# Altium PCB NB3000XN.PcbDoc (part 17 of 71)
Units mil, origin at the board's own origin, x right, y up, seen from the top; angles counter-clockwise.
Board outline 9527.56 x 6929.77 mil, 6 copper layers (Top Layer, GND+SHIELD, MidLayer1, MidLayer2, P2 - 3V3+5V0, Bottom Layer), stack 62.375 mil thick; 832 components, 1027 nets, 4655 pads, 4981 vias.
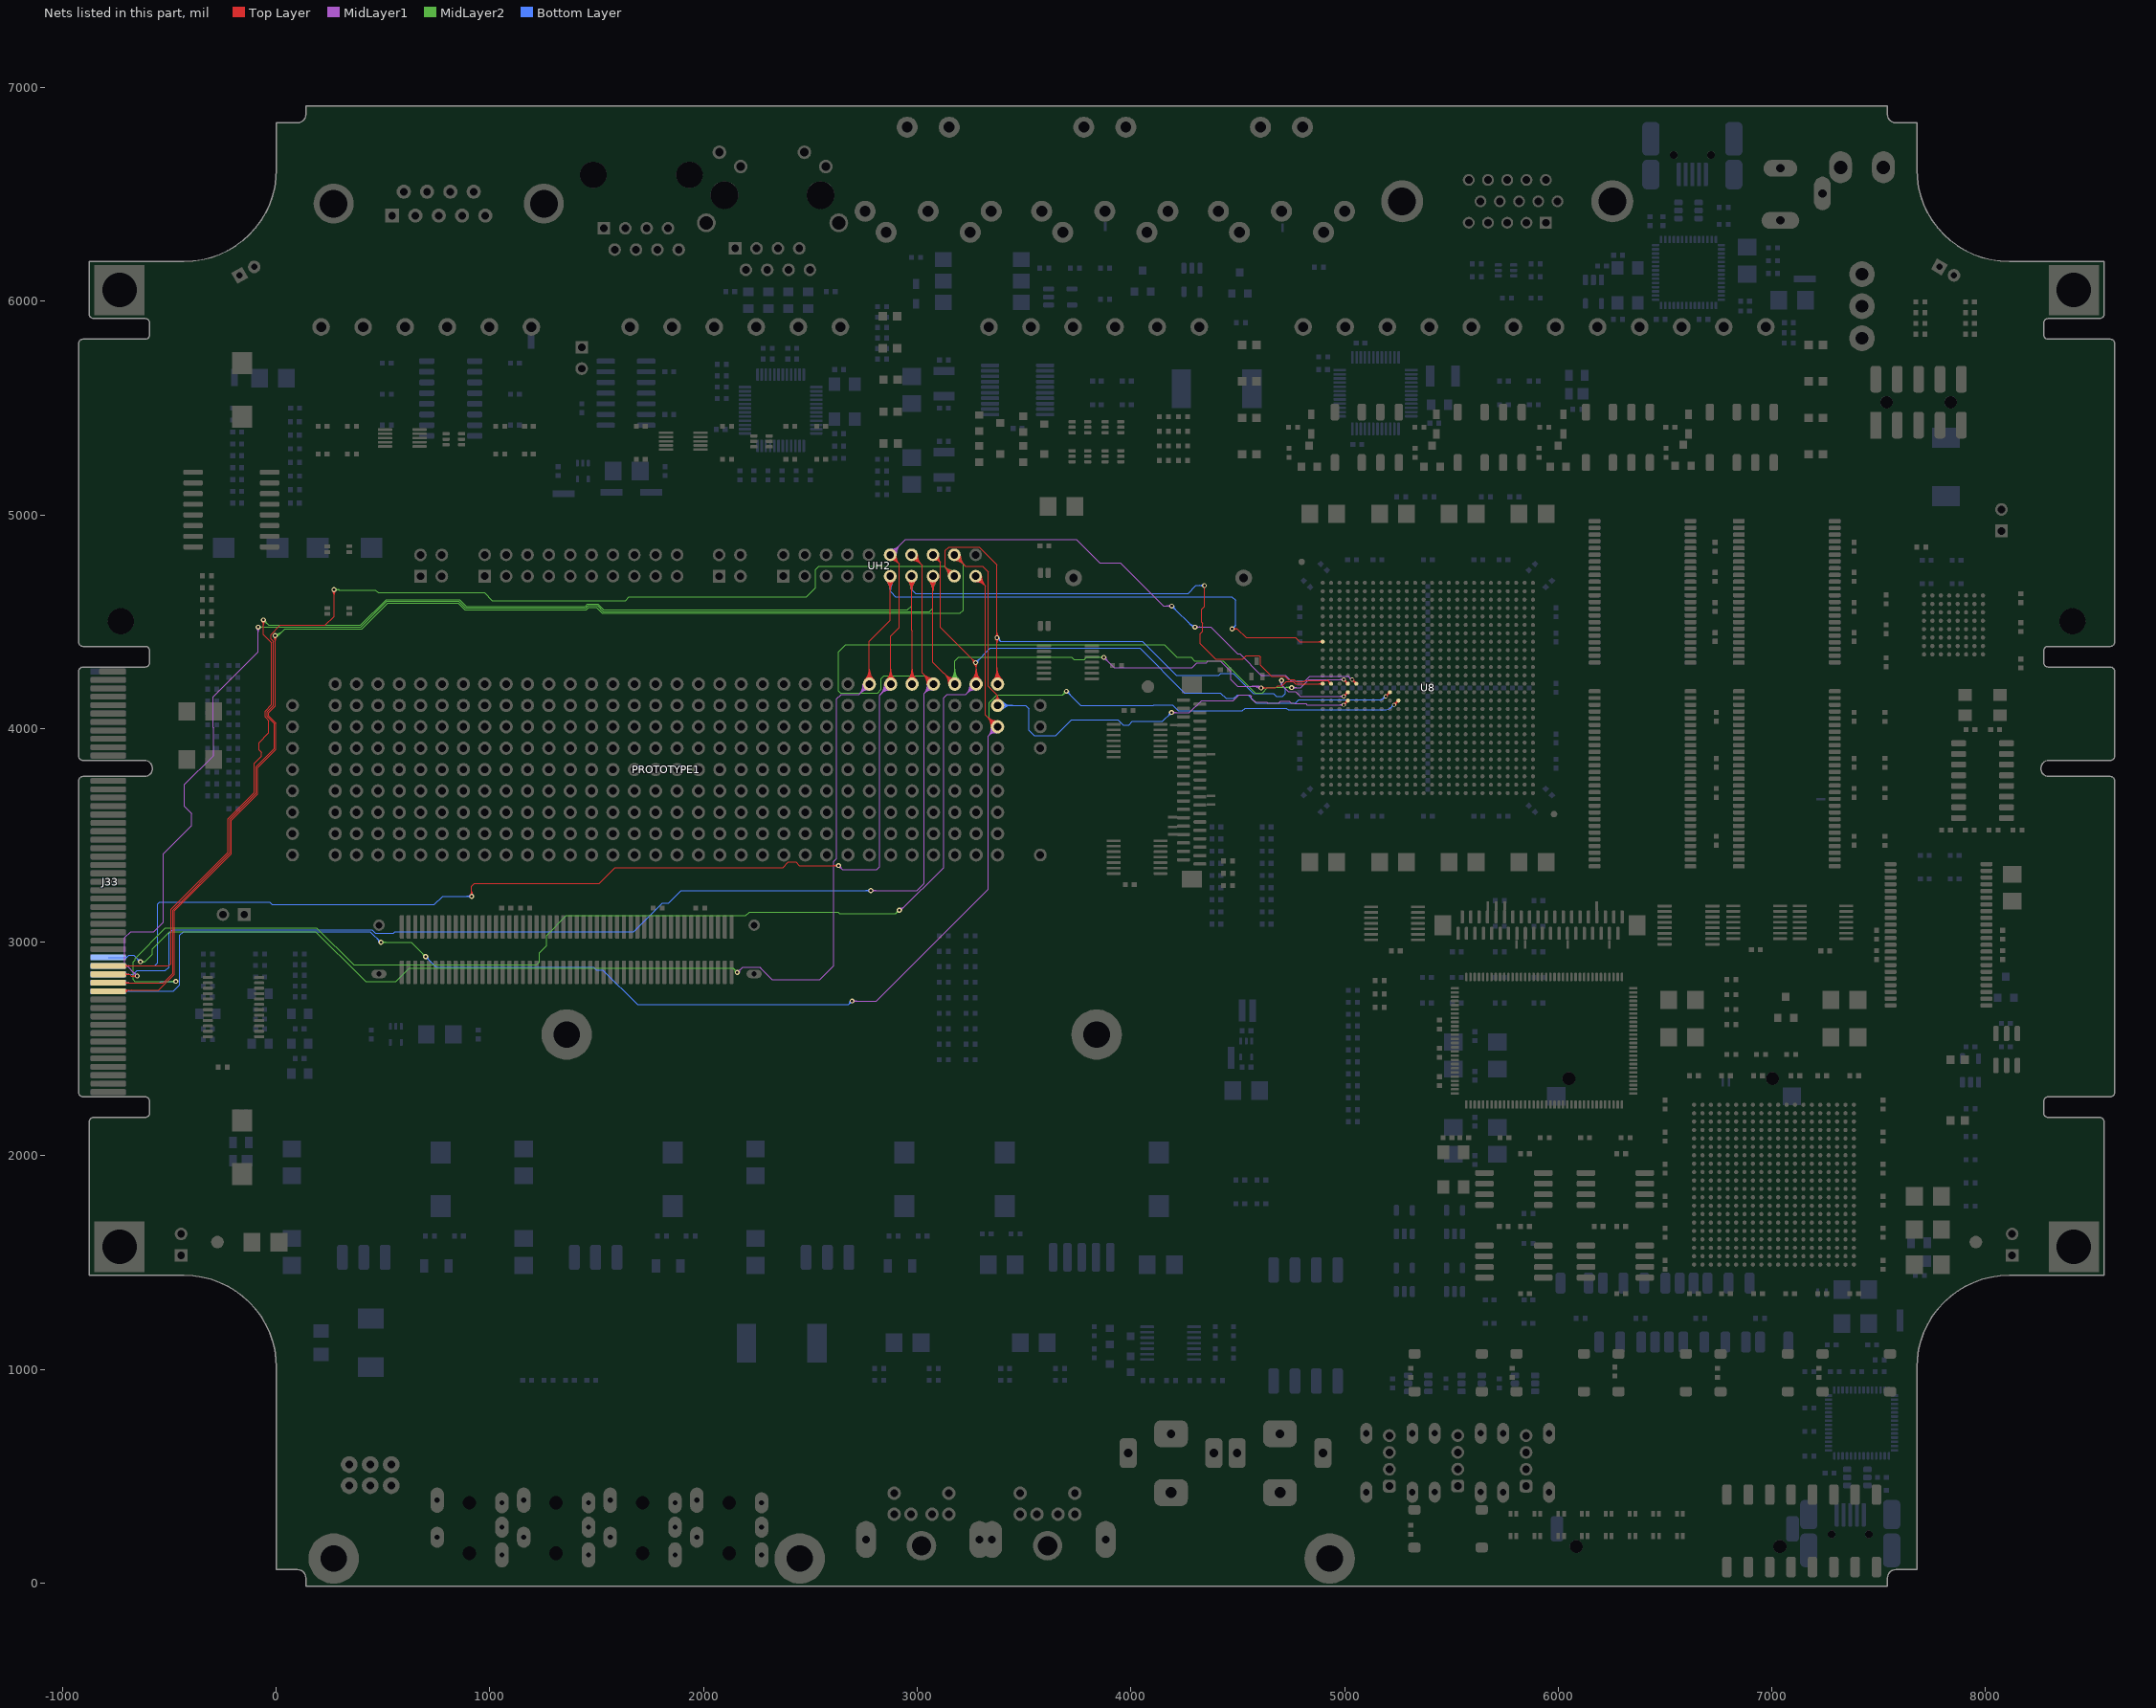
[diagram p21: the nets of this part, all layers, seen from the top]

## Via types
v1: diameter 23, hole 11.81, Top Layer to Bottom Layer, 3672 vias
v2: diameter 26, hole 11.81, Top Layer to Bottom Layer, 461 vias
v3: diameter 19, hole 11.81, Top Layer to Bottom Layer, tented both sides, 396 vias
v4: diameter 23.62, hole 11.81, Top Layer to Bottom Layer, 288 vias
v5: diameter 20, hole 11.81, Top Layer to Bottom Layer, 91 vias
v6: diameter 23, hole 11.81, Top Layer to Bottom Layer, tented both sides, 50 vias
v7: diameter 31, hole 11.81, Top Layer to Bottom Layer, 15 vias
v8: diameter 27.56, hole 11.81, Top Layer to Bottom Layer, tented both sides, 4 vias
v9: diameter 29, hole 11.81, Top Layer to Bottom Layer, 3 vias
v10: diameter 21, hole 11.81, Top Layer to Bottom Layer, 1 vias

## Nets (pads, with @x,y where several pads share a name; then routed paths per layer and width w, separated by ;. In a path a pad name is that pad's centre, name@x,y a point inside that pad or via, vN(x,y) a via of type N, cw(c..) or ccw(c..) an arc to the next point about the centre after c; other vN are vias at no path point) (continued)
ATE.UIO.IO27: J33.B33 PROTOTYPE1.H26 U8.H1 UH2.11 | length 9772.1
  Top Layer w4: PROTOTYPE1.H26@2755.62,4228.74 ccw(c2706.11,4278.25) 2776.12,4278.25 ccw(c2846.13,4278.25) PROTOTYPE1.H26@2796.63,4228.74 ; PROTOTYPE1.H26@2758.44,4225.91 ccw(c2715.77,4268.59) 2776.12,4268.59 ccw(c2836.48,4268.59) PROTOTYPE1.H26@2793.8,4225.91 ; PROTOTYPE1.H26@2761.27,4223.08 ccw(c2725.42,4258.93) 2776.12,4258.93 ccw(c2826.82,4258.93) PROTOTYPE1.H26@2790.97,4223.08 ; PROTOTYPE1.H26@2764.1,4220.26 ccw(c2735.08,4249.28) 2776.12,4249.28 ccw(c2817.16,4249.28) PROTOTYPE1.H26@2788.14,4220.26 ; PROTOTYPE1.H26@2766.93,4217.43 ccw(c2744.74,4239.62) 2776.12,4239.62 ccw(c2807.51,4239.62) PROTOTYPE1.H26@2785.31,4217.43 ; PROTOTYPE1.H26@2776.12,4208.23 2776.12,4408.37 2873.76,4506.01 UH2.11@2873.76,4713.23 ; UH2.11@2854.29,4693.77 cw(c2807.3,4646.78) 2873.76,4646.78 cw(c2940.21,4646.78) UH2.11@2893.22,4693.77 ; UH2.11@2857.12,4696.6 cw(c2816.96,4656.43) 2873.76,4656.43 cw(c2930.56,4656.43) UH2.11@2890.4,4696.6 ; UH2.11@2859.95,4699.43 cw(c2826.61,4666.09) 2873.76,4666.09 cw(c2920.9,4666.09) UH2.11@2887.57,4699.43 ; UH2.11@2862.78,4702.25 cw(c2836.27,4675.75) 2873.76,4675.75 cw(c2911.24,4675.75) UH2.11@2884.74,4702.25 ; v1(4473.52,4466.71) 4498.29,4466.71 4539.13,4425.87 4770.7,4425.87 4790.03,4406.54 4860,4406.54 4870,4406.54 U8.H1@4897.87,4406.54 ; v1@4477.41,4462.82 cw(c4486.8,4453.43) 4486.8,4466.71 cw(c4486.8,4479.99) v1@4477.41,4470.6 ; v1@4480.24,4459.99 cw(c4496.46,4443.77) 4496.46,4466.71 cw(c4496.46,4489.64) v1@4480.24,4473.43 ; U8.H1@4892.57,4401.23 ccw(c4879.77,4388.43) 4879.77,4406.54 ccw(c4879.77,4424.64) U8.H1@4892.57,4411.84 ; U8.H1@4892.68,4401.34 ccw(c4880.15,4388.81) 4880.15,4406.54 ccw(c4880.15,4424.26) U8.H1@4892.68,4411.73
  MidLayer1 w4: v1(2157.86,2858.37) 2182.86,2883.37 2263.86,2883.37 2266.12,2881.12 ; v1@2157.86,2863.87 ccw(c2157.86,2877.15) 2167.25,2867.76 ccw(c2176.64,2858.37) v1@2163.36,2858.37 ; v1@2157.86,2867.87 ccw(c2157.86,2890.81) 2174.07,2874.59 ccw(c2190.29,2858.37) v1@2167.36,2858.37 ; 2265,2880 2320.29,2824.71 2545.21,2824.71 2610,2889.5 2610,3378.18 2623.52,3391.71 2623.52,4138.52 2645,4160 2727.89,4160 ; PROTOTYPE1.H26@2747.13,4207.7 cw(c2681.42,4206.47) 2727.89,4160 ; PROTOTYPE1.H26@2751.13,4207.77 cw(c2694.48,4206.72) 2734.54,4166.66 cw(c2774.6,4126.59) PROTOTYPE1.H26@2775.66,4183.24 ; PROTOTYPE1.H26@2755.12,4207.84 cw(c2707.54,4206.96) 2741.19,4173.31 cw(c2774.85,4139.66) PROTOTYPE1.H26@2775.73,4187.24 ; PROTOTYPE1.H26@2759.12,4207.92 cw(c2720.61,4207.2) 2747.85,4179.96 cw(c2775.09,4152.72) PROTOTYPE1.H26@2775.8,4191.24 ; PROTOTYPE1.H26@2775.58,4179.24 ccw(c2774.36,4113.53) 2727.89,4160 ; PROTOTYPE1.H26@2776.12,4208.23 2727.89,4160
  MidLayer2 w4: v1(-635.48,2908.37) -615,2908.37 ; v1@-631.28,2904.82 cw(c-623.62,2898.35) -623.62,2908.37 cw(c-623.62,2918.4) v1@-631.28,2911.93 ; v1@-628.22,2902.24 cw(c-615,2891.06) -615,2908.37 ; v1@-628.22,2914.51 ccw(c-615,2925.69) -615,2908.37 ; v1@2148.36,2858.37 ccw(c2125.42,2858.37) 2141.64,2874.59 ccw(c2157.86,2890.81) v1@2157.86,2867.87 ; v1@2152.36,2858.37 ccw(c2139.08,2858.37) 2148.47,2867.76 ccw(c2157.86,2877.15) v1@2157.86,2863.87 ; v1(2157.86,2858.37) 2138.23,2878 623,2878 560,2815 418.69,2815 395.84,2837.85 183.65,3050.04 -498.5,3050.04 -580,2968.54 -580,2943.37 -615,2908.37
  Bottom Layer w4: J33.B33@-785.98,2928.45 -701.3,2928.45 ; J33.B33@-705.79,2925.1 cw(c-701.31,2923.77) -701.31,2928.45 ; J33.B33@-705.79,2931.8 ccw(c-701.31,2933.13) -701.31,2928.45 ; v1@-644.98,2908.37 ccw(c-667.91,2908.37) -651.69,2924.59 ccw(c-635.48,2940.81) v1@-635.48,2917.87 ; v1@-640.98,2908.37 ccw(c-654.25,2908.37) -644.86,2917.76 ccw(c-635.48,2927.15) v1@-635.48,2913.87 ; v1(-635.48,2908.37) -667.45,2940.35 -689.41,2940.35 -701.3,2928.45 ; UH2.11@2854.29,4693.77 cw(c2804.3,4643.78) 2875,4643.78 ; UH2.11@2857.12,4696.6 cw(c2813.96,4653.44) 2875,4653.44 ; UH2.11@2859.95,4699.43 cw(c2823.62,4663.09) 2875,4663.09 ; UH2.11@2862.78,4702.25 cw(c2833.28,4672.75) 2875,4672.75 ; UH2.11@2865.61,4705.08 cw(c2842.93,4682.41) 2875,4682.41 ; UH2.11@2873.76,4713.23 UH2.11@2875,4713.23 ; 2875,4649.77 cw(c2937.22,4649.77) UH2.11@2893.22,4693.77 ; 2875,4659.43 cw(c2927.56,4659.43) UH2.11@2890.4,4696.6 ; 2875,4669.09 cw(c2917.91,4669.09) UH2.11@2887.57,4699.43 ; 2875,4678.74 cw(c2908.25,4678.74) UH2.11@2884.74,4702.25 ; UH2.11@2875,4715 UH2.11@2875,4713.23 ; v1(4473.52,4466.71) 4490.19,4483.37 4490.19,4600.04 4473.52,4616.71 2898.52,4616.71 2875,4640.23 UH2.11@2875,4713.23 ; v1@4473.52,4472.21 ccw(c4473.52,4485.49) 4482.91,4476.1 ccw(c4492.3,4466.71) v1@4479.02,4466.71 ; v1@4473.52,4476.21 ccw(c4473.52,4499.14) 4489.74,4482.93 ccw(c4505.96,4466.71) v1@4483.02,4466.71
ATE.UIO.IO28: J33.B34 PROTOTYPE1.H27 U8.N5 UH2.12 | length 10153.7
  Top Layer w4: v1@908.3,3221.74 ccw(c892.14,3238.01) 915.07,3237.93 ccw(c938.01,3237.86) v1@921.74,3221.7 ; v1@911.12,3218.9 ccw(c901.76,3228.32) 915.04,3228.28 ccw(c928.32,3228.24) v1@918.9,3218.88 ; v1(915,3215) 915.15,3262.19 928,3275.04 1512.21,3275.04 1586.88,3349.71 2371.52,3349.71 2396.86,3375.04 2431.86,3375.04 2448.52,3358.37 v1(2631.86,3358.37) ; v1@2625.14,3351.66 ccw(c2608.92,3335.44) 2608.92,3358.37 ccw(c2608.92,3381.31) v1@2625.14,3365.09 ; v1@2627.97,3354.49 ccw(c2618.58,3345.1) 2618.58,3358.37 ccw(c2618.58,3371.65) v1@2627.97,3362.26 ; PROTOTYPE1.H27@2855.62,4228.74 ccw(c2806.11,4278.25) 2876.12,4278.25 ccw(c2946.13,4278.25) PROTOTYPE1.H27@2896.63,4228.74 ; PROTOTYPE1.H27@2858.44,4225.91 ccw(c2815.77,4268.59) 2876.12,4268.59 ccw(c2936.48,4268.59) PROTOTYPE1.H27@2893.8,4225.91 ; PROTOTYPE1.H27@2861.27,4223.08 ccw(c2825.42,4258.93) 2876.12,4258.93 ccw(c2926.82,4258.93) PROTOTYPE1.H27@2890.97,4223.08 ; PROTOTYPE1.H27@2864.1,4220.26 ccw(c2835.08,4249.28) 2876.12,4249.28 ccw(c2917.16,4249.28) PROTOTYPE1.H27@2888.14,4220.26 ; PROTOTYPE1.H27@2866.93,4217.43 ccw(c2844.74,4239.62) 2876.12,4239.62 ccw(c2907.51,4239.62) PROTOTYPE1.H27@2885.31,4217.43 ; UH2.12@2873.76,4813.23 2915.19,4771.8 ; UH2.12@2875.2,4797.77 cw(c2877.75,4770.48) 2897.13,4789.86 cw(c2916.51,4809.24) UH2.12@2889.22,4811.79 ; UH2.12@2875.57,4793.79 cw(c2878.77,4759.47) 2903.15,4783.84 cw(c2927.52,4808.22) UH2.12@2893.2,4811.42 ; UH2.12@2875.94,4789.81 cw(c2879.8,4748.46) 2909.17,4777.82 cw(c2938.53,4807.19) UH2.12@2897.18,4811.05 ; PROTOTYPE1.H27@2876.12,4208.23 2876.12,4433.37 2915.19,4472.44 2915.19,4771.8 ; UH2.12@2876.32,4785.83 cw(c2880.83,4737.45) 2915.19,4771.8 ; UH2.12@2901.17,4810.68 ccw(c2949.55,4806.16) 2915.19,4771.8 ; v3(5035.67,4229.37) U8.N5@5055.35,4209.69 ; U8.N5@5047.85,4209.69 ccw(c5029.75,4209.69) 5042.55,4222.49 ccw(c5055.35,4235.29) U8.N5@5055.35,4217.19 ; U8.N5@5048.01,4209.69 ccw(c5030.29,4209.69) 5042.82,4222.22 ccw(c5055.35,4234.75) U8.N5@5055.35,4217.03 ; 5048.47,4216.57 ccw(c5035.67,4203.76) 5035.67,4221.87 cw(c5035.67,4203.76) 5048.47,4216.57 ; 5048.47,4216.57 cw(c5061.28,4229.37) 5043.17,4229.37 ccw(c5061.28,4229.37) 5048.47,4216.57
  MidLayer1 w4: v1@2631.86,3348.87 cw(c2631.86,3325.94) 2648.07,3342.16 cw(c2664.29,3358.37) v1@2641.36,3358.37 ; v1@2631.86,3352.87 cw(c2631.86,3339.6) 2641.25,3348.99 cw(c2650.64,3358.37) v1@2637.36,3358.37 ; v1(2631.86,3358.37) 2650.23,3340 2810,3340 2823.52,3353.52 2823.52,4155.64 PROTOTYPE1.H27@2876.12,4208.23 ; PROTOTYPE1.H27@2847.12,4208.23 cw(c2777.11,4208.23) 2826.62,4158.73 cw(c2876.12,4109.22) PROTOTYPE1.H27@2876.12,4179.23 ; PROTOTYPE1.H27@2851.12,4208.23 cw(c2790.77,4208.23) 2833.44,4165.56 cw(c2876.12,4122.88) PROTOTYPE1.H27@2876.12,4183.23 ; PROTOTYPE1.H27@2855.12,4208.23 cw(c2804.42,4208.23) 2840.27,4172.39 cw(c2876.12,4136.54) PROTOTYPE1.H27@2876.12,4187.23 ; PROTOTYPE1.H27@2859.12,4208.23 cw(c2818.08,4208.23) 2847.1,4179.21 cw(c2876.12,4150.19) PROTOTYPE1.H27@2876.12,4191.23 ; PROTOTYPE1.H27@2863.12,4208.23 cw(c2831.74,4208.23) 2853.93,4186.04 cw(c2876.12,4163.85) PROTOTYPE1.H27@2876.12,4195.23 ; UH2.12@2873.52,4813.23 UH2.12@2873.76,4813.23 2945.54,4885 3744.71,4885 3855,4774.71 3951.61,4774.71 4152.61,4573.71 v1(4191.52,4573.71) ; UH2.12@2873.76,4828.76 ccw(c2873.76,4866.28) 2900.29,4839.75 ; UH2.12@2873.76,4832.76 ccw(c2873.76,4879.93) 2907.11,4846.58 ; UH2.12@2873.76,4836.76 ccw(c2873.76,4893.59) 2913.94,4853.41 ; UH2.12@2873.76,4840.76 ccw(c2873.76,4907.25) 2920.77,4860.23 ; UH2.12@2889.29,4813.23 cw(c2926.74,4813.23) 2900.26,4839.72 ; UH2.12@2893.29,4813.23 cw(c2940.4,4813.23) 2907.09,4846.55 ; UH2.12@2897.29,4813.23 cw(c2954.06,4813.23) 2913.91,4853.38 ; UH2.12@2901.29,4813.23 cw(c2967.71,4813.23) 2920.74,4860.21 ; v1@4184.81,4566.99 ccw(c4168.59,4550.77) 4168.59,4573.71 ccw(c4168.59,4596.64) v1@4184.81,4580.43 ; v1@4187.64,4569.82 ccw(c4178.25,4560.43) 4178.25,4573.71 ccw(c4178.25,4586.99) v1@4187.64,4577.6 ; v1@4303.89,4471.11 cw(c4313.38,4461.62) 4313.38,4475.04 ; v1@4303.89,4478.89 ccw(c4313.18,4488.18) 4313.18,4475.04 ; v1@4306.72,4468.28 cw(c4323.03,4451.97) 4323.03,4475.04 ; v1@4306.72,4481.72 ccw(c4322.84,4497.84) 4322.84,4475.04 ; 5022.09,4240.76 ccw(c5012.16,4230.83) 5012.16,4244.88 4918.62,4244.88 4870,4244.88 4860,4244.88 4837.69,4244.88 4815.19,4222.37 4751.19,4222.37 4723.52,4250.04 4609.84,4250.04 4509.84,4350.04 4498.52,4350.04 4373.52,4475.04 v1@4300.04,4475.04 ; v3@5028.2,4228.72 ccw(c5010.16,4227.14) 5021.8,4241.01 ccw(c5033.44,4254.88) v3@5035.02,4236.84 ; v1(4300,4475) v1@4300.04,4475.04
  Bottom Layer w4: J33.B34@-785.98,2889.08 -567.81,2889.08 -554.41,2902.48 -554.41,3179.28 -546.69,3187 -29.82,3187 -19,3176.19 740.09,3176.19 778.9,3215 v1(915,3215) ; J33.B34@-711.58,2883.58 cw(c-698.3,2870.3) -698.3,2889.08 ; J33.B34@-711.58,2894.58 ccw(c-698.3,2907.86) -698.3,2889.08 ; J33.B34@-708.76,2880.75 cw(c-688.65,2860.64) -688.65,2889.08 cw(c-688.64,2917.52) J33.B34@-708.76,2897.41 ; v1@908.28,3208.28 ccw(c892.06,3192.06) 892.06,3215 ccw(c892.06,3237.93) v1@908.28,3221.72 ; v1@911.11,3211.11 ccw(c901.72,3201.72) 901.72,3215 ccw(c901.72,3228.28) v1@911.11,3218.89 ; v1@4191.52,4564.21 cw(c4191.52,4541.27) 4207.74,4557.49 cw(c4223.96,4573.71) v1@4201.02,4573.71 ; v1@4191.52,4568.21 cw(c4191.52,4554.93) 4200.91,4564.32 cw(c4210.3,4573.71) v1@4197.02,4573.71 ; v1(4191.52,4573.71) 4290.19,4475.04 4306.86,4475.04 4306.82,4475 v1(4300,4475) ; 4267.11,4498.13 ccw(c4300,4531.02) v1@4300,4484.5 ; 4273.93,4491.3 ccw(c4300,4517.36) v1@4300,4480.5 ; 4280.76,4484.47 ccw(c4300,4503.71) v1@4300,4476.5 ; 4287.59,4477.64 ccw(c4300,4490.05) v1@4300,4472.5
ATE.UIO.IO29: J33.A34 PROTOTYPE1.H28 U8.N2 UH2.13 | length 9997.1
  Top Layer w4: J33.A34@-785.98,2889.08 -503.06,2889.08 -492.14,2900 -492.14,3154.02 -292.32,3353.85 -225.35,3420.81 -225.35,3578.34 -102,3701.69 -102,3838.1 -68.14,3871.96 -68.14,3888.14 -81,3901 -81,3933.85 -35,3979.85 -35,4037.56 -51.48,4054.04 -51.48,4081.15 -21,4111.63 -21,4401 -59.81,4439.81 v1(-59.81,4508.37) ; J33.A34@-711.58,2883.58 cw(c-698.3,2870.3) -698.3,2889.08 ; J33.A34@-711.58,2894.58 ccw(c-698.3,2907.86) -698.3,2889.08 ; J33.A34@-708.76,2880.75 cw(c-688.65,2860.64) -688.65,2889.08 cw(c-688.64,2917.52) J33.A34@-708.76,2897.41 ; v1@-66.53,4501.66 cw(c-82.74,4485.44) -59.81,4485.44 cw(c-36.87,4485.44) v1@-53.09,4501.66 ; v1@-63.7,4504.49 cw(c-73.09,4495.1) -59.81,4495.1 cw(c-46.53,4495.1) v1@-55.92,4504.49 ; UH2.13@2954.29,4693.77 cw(c2907.3,4646.78) 2973.76,4646.78 cw(c3040.21,4646.78) UH2.13@2993.22,4693.77 ; PROTOTYPE1.H28@2955.62,4228.74 ccw(c2906.11,4278.25) 2976.12,4278.25 ccw(c3046.13,4278.25) PROTOTYPE1.H28@2996.63,4228.74 ; UH2.13@2957.12,4696.6 cw(c2916.96,4656.43) 2973.76,4656.43 cw(c3030.56,4656.43) UH2.13@2990.4,4696.6 ; PROTOTYPE1.H28@2958.44,4225.91 ccw(c2915.77,4268.59) 2976.12,4268.59 ccw(c3036.48,4268.59) PROTOTYPE1.H28@2993.8,4225.91 ; UH2.13@2959.95,4699.43 cw(c2926.61,4666.09) 2973.76,4666.09 cw(c3020.9,4666.09) UH2.13@2987.57,4699.43 ; PROTOTYPE1.H28@2961.27,4223.08 ccw(c2925.42,4258.93) 2976.12,4258.93 ccw(c3026.82,4258.93) PROTOTYPE1.H28@2990.97,4223.08 ; UH2.13@2962.78,4702.25 cw(c2936.27,4675.75) 2973.76,4675.75 cw(c3011.24,4675.75) UH2.13@2984.74,4702.25 ; PROTOTYPE1.H28@2964.1,4220.26 ccw(c2935.08,4249.28) 2976.12,4249.28 ccw(c3017.16,4249.28) PROTOTYPE1.H28@2988.14,4220.26 ; PROTOTYPE1.H28@2966.93,4217.43 ccw(c2944.74,4239.62) 2976.12,4239.62 ccw(c3007.51,4239.62) PROTOTYPE1.H28@2985.31,4217.43 ; UH2.13@2973.76,4713.23 2973.76,4460.74 2976.12,4458.37 PROTOTYPE1.H28@2976.12,4208.23 ; v1(4344.52,4669.37) 4344.52,4570.84 4332,4558.31 4332,4497.27 4335,4494.27 4335,4454.52 4331.86,4451.37 ; U8.N2@4929.9,4209.69 ccw(c4912.17,4209.69) 4924.71,4222.22 ; U8.N2@4937.24,4217.03 cw(c4937.24,4234.75) 4924.71,4222.22 ; 4324.02,4443.54 4331.86,4451.37 ; 4324.02,4443.54 4331.86,4451.37 ; 4324.02,4443.54 4324.02,4397.81 4396.8,4325.04 4523.52,4325.04 4540.19,4341.71 4600.52,4341.71 4606.86,4335.37 4606.86,4296.71 4658.52,4245.04 4720.21,4245.04 4736.54,4228.71 4746,4228.71 4762.92,4228.71 4771.63,4220 4786.9,4220 4801,4220 4810,4220 4815.19,4225.19 4855.26,4225.19 4860,4225.19 4870,4225.19 4917.53,4225.19 cw(c4917.53,4215.04) 4924.71,4222.22
  MidLayer2 w4: v1@-59.81,4498.87 cw(c-59.81,4475.94) -43.59,4492.16 cw(c-27.37,4508.37) v1@-50.31,4508.37 ; v1@-59.81,4502.87 cw(c-59.81,4489.6) -50.42,4498.99 cw(c-41.03,4508.37) v1@-54.31,4508.37 ; v1(-59.81,4508.37) -34.81,4483.37 394.96,4483.37 515.4,4603.81 858,4603.81 889.31,4572.5 1445.98,4572.5 1448.52,4575.04 1456.86,4583.37 1505.5,4583.37 1532.88,4556 2955,4556 2973.76,4574.76 UH2.13@2973.76,4713.23 ; UH2.13@2954.29,4693.77 cw(c2907.3,4646.78) 2973.76,4646.78 cw(c3040.22,4646.78) UH2.13@2993.22,4693.77 ; UH2.13@2957.12,4696.6 cw(c2916.96,4656.43) 2973.76,4656.43 cw(c3030.56,4656.43) UH2.13@2990.4,4696.6 ; UH2.13@2959.95,4699.43 cw(c2926.62,4666.09) 2973.76,4666.09 cw(c3020.9,4666.09) UH2.13@2987.57,4699.43 ; UH2.13@2962.78,4702.25 cw(c2936.27,4675.75) 2973.76,4675.75 cw(c3011.25,4675.75) UH2.13@2984.74,4702.25
  Bottom Layer w4: UH2.13@2955.3,4692.81 cw(c2917.73,4651.24) 2973.76,4651.24 ; UH2.13@2957.98,4695.78 cw(c2925.87,4660.25) 2973.76,4660.25 cw(c3021.65,4660.25) UH2.13@2989.54,4695.78 ; UH2.13@2960.66,4698.75 cw(c2934.01,4669.26) 2973.76,4669.26 cw(c3013.51,4669.26) UH2.13@2986.85,4698.75 ; UH2.13@2963.35,4701.72 cw(c2942.15,4678.27) 2973.76,4678.27 cw(c3005.37,4678.27) UH2.13@2984.17,4701.72 ; UH2.13@2973.76,4713.23 2973.76,4651.24 ; UH2.13@2992.22,4692.81 ccw(c3029.79,4651.24) 2973.76,4651.24 ; v1@4337.81,4662.66 ccw(c4321.59,4646.44) 4321.59,4669.37 ccw(c4321.59,4692.31) v1@4337.81,4676.09 ; v1@4340.64,4665.49 ccw(c4331.25,4656.1) 4331.25,4669.37 ccw(c4331.25,4682.65) v1@4340.64,4673.26 ; v1(4344.52,4669.37) 4304.37,4669.37 4267.71,4632.71 2992.29,4632.71 2973.76,4651.24
ATE.UIO.IO30: J33.B35 PROTOTYPE1.H29 U8.N4 UH2.14 | length 10675.6
  Top Layer w4: UH2.14@2973.76,4785.71 cw(c2973.76,4719.25) 3020.75,4766.24 cw(c3067.74,4813.23) UH2.14@3001.29,4813.23 ; UH2.14@2973.76,4789.71 cw(c2973.76,4732.91) 3013.92,4773.07 cw(c3054.09,4813.23) UH2.14@2997.29,4813.23 ; UH2.14@2973.76,4793.71 cw(c2973.76,4746.56) 3007.09,4779.9 cw(c3040.43,4813.23) UH2.14@2993.29,4813.23 ; UH2.14@2973.76,4797.71 cw(c2973.76,4760.22) 3000.27,4786.73 cw(c3026.77,4813.23) UH2.14@2989.29,4813.23 ; UH2.14@2973.76,4813.23 3023.52,4763.47 3023.52,4260.83 PROTOTYPE1.H29@3076.12,4208.23 ; PROTOTYPE1.H29@3047.12,4208.23 ccw(c2977.11,4208.23) 3026.62,4257.74 ccw(c3076.12,4307.25) PROTOTYPE1.H29@3076.12,4237.23 ; PROTOTYPE1.H29@3051.12,4208.23 ccw(c2990.77,4208.23) 3033.44,4250.91 ccw(c3076.12,4293.59) PROTOTYPE1.H29@3076.12,4233.23 ; PROTOTYPE1.H29@3055.12,4208.23 ccw(c3004.42,4208.23) 3040.27,4244.08 ccw(c3076.12,4279.93) PROTOTYPE1.H29@3076.12,4229.23 ; PROTOTYPE1.H29@3059.12,4208.23 ccw(c3018.08,4208.23) 3047.1,4237.26 ccw(c3076.12,4266.28) PROTOTYPE1.H29@3076.12,4225.23 ; PROTOTYPE1.H29@3063.12,4208.23 ccw(c3031.74,4208.23) 3053.93,4230.43 ccw(c3076.12,4252.62) PROTOTYPE1.H29@3076.12,4221.23 ; v3(4996.3,4229.37) U8.N4@5015.98,4209.69 ; U8.N4@5008.48,4209.69 ccw(c4990.38,4209.69) 5003.18,4222.49 ccw(c5015.98,4235.29) U8.N4@5015.98,4217.19 ; U8.N4@5008.64,4209.69 ccw(c4990.92,4209.69) 5003.45,4222.22 ccw(c5015.98,4234.75) U8.N4@5015.98,4217.03 ; 5009.1,4216.57 cw(c5021.91,4229.37) 5003.8,4229.37 ccw(c5021.91,4229.37) 5009.1,4216.57 ; 5009.1,4216.57 ccw(c4996.3,4203.76) 4996.3,4221.87 cw(c4996.3,4203.76) 5009.1,4216.57
  MidLayer1 w4: v1(2782.86,3241.71) 2998.52,3241.71 3031.86,3275.04 3031.86,4163.97 ; v1@2786.75,3237.82 cw(c2796.14,3228.43) 2796.14,3241.71 cw(c2796.14,3254.99) v1@2786.75,3245.6 ; v1@2789.57,3234.99 cw(c2805.79,3218.77) 2805.79,3241.71 cw(c2805.79,3264.64) v1@2789.57,3248.43 ; PROTOTYPE1.H29@3047.22,4205.85 cw(c2994.34,4201.49) 3031.86,4163.97 ; PROTOTYPE1.H29@3051.21,4206.18 cw(c3005.62,4202.42) 3037.96,4170.08 cw(c3070.31,4137.74) PROTOTYPE1.H29@3074.07,4183.32 ; PROTOTYPE1.H29@3055.19,4206.51 cw(c3016.9,4203.35) 3044.07,4176.18 cw(c3071.24,4149.02) PROTOTYPE1.H29@3074.39,4187.31 ; PROTOTYPE1.H29@3059.18,4206.84 cw(c3028.18,4204.28) 3050.17,4182.29 cw(c3072.17,4160.3) PROTOTYPE1.H29@3074.72,4191.29 ; PROTOTYPE1.H29@3073.74,4179.33 ccw(c3069.37,4126.46) 3031.86,4163.97 ; PROTOTYPE1.H29@3076.12,4208.23 3031.86,4163.97 ; v1(4752.52,4191.71) 4795.84,4191.71 4833.5,4229.37 4855.26,4229.37 4860,4229.37 4870,4229.37 4918.62,4229.37 v3(4996.3,4229.37) ; v1@4756.41,4187.82 cw(c4765.8,4178.43) 4765.8,4191.71 cw(c4765.8,4204.99) v1@4756.41,4195.6 ; v1@4759.24,4184.99 cw(c4775.46,4168.77) 4775.46,4191.71 cw(c4775.46,4214.64) v1@4759.24,4198.43 ; v3@4991.11,4224.18 ccw(c4978.57,4211.64) 4978.57,4229.37 ccw(c4978.57,4247.1) v3@4991.11,4234.56 ; 4978.19,4229.37 cw(c4978.19,4211.26) 4991,4224.07 ccw(c4978.19,4211.26) 4978.19,4229.37 ; 4978.19,4229.37 ccw(c4978.19,4247.48) 4991,4234.67 cw(c4978.19,4247.48) 4978.19,4229.37
  MidLayer2 w4: PROTOTYPE1.H29@3047.62,4213.59 ccw(c3010.68,4220.52) 3037.26,4247.1 ; PROTOTYPE1.H29@3051.55,4212.85 ccw(c3019.7,4218.83) 3042.62,4241.74 ccw(c3065.53,4264.65) PROTOTYPE1.H29@3071.51,4232.81 ; PROTOTYPE1.H29@3055.48,4212.11 ccw(c3028.73,4217.13) 3047.98,4236.38 ccw(c3067.22,4255.63) PROTOTYPE1.H29@3072.25,4228.87 ; PROTOTYPE1.H29@3059.41,4211.37 ccw(c3037.76,4215.44) 3053.34,4231.02 ccw(c3068.92,4246.6) PROTOTYPE1.H29@3072.98,4224.94 ; PROTOTYPE1.H29@3070.77,4236.74 cw(c3063.83,4273.68) 3037.26,4247.1 ; PROTOTYPE1.H29@3076.12,4208.23 3037.25,4247.1 ; 4727.17,4192.71 cw(c4727.17,4166.36) v1@4745.81,4184.99 ; 4732,4192.71 ccw(c4732,4212.23) v1@4745.81,4198.43 ; 4736.83,4192.71 cw(c4736.83,4176.02) v1@4748.64,4187.82 ; v1(4752.52,4191.71) 4751.52,4192.71 4641.19,4192.71 4615.19,4166.71 4581.86,4166.71 4432.52,4316.04 4298.86,4316.04 4281.52,4333.37 4215.19,4333.37 4156.86,4391.71 2665.19,4391.71 2631.86,4358.37 2631.86,4175.04 2640.19,4166.71 2815.19,4166.71 2831.86,4183.37 2831.86,4233.37 2845.59,4247.1 3037.25,4247.1
  Bottom Layer w4: J33.B35@-785.98,2849.71 -668.14,2849.71 -651.14,2866.71 -518.14,2866.71 -501.48,2883.37 -501.48,3041.71 -484.81,3058.37 448.33,3058.37 465,3041.71 550,3041.71 556.6,3048.31 1672.48,3048.31 1807.21,3183.04 1836.88,3183.04 1895.54,3241.71 v1(2782.86,3241.71) ; J33.B35@-711.58,2844.21 cw(c-698.3,2830.93) -698.3,2849.71 ; J33.B35@-711.58,2855.21 ccw(c-698.3,2868.49) -698.3,2849.71 ; J33.B35@-708.76,2841.38 cw(c-688.65,2821.27) -688.65,2849.71 cw(c-688.64,2878.15) J33.B35@-708.76,2858.04 ; v1@2776.14,3234.99 ccw(c2759.92,3218.77) 2759.92,3241.71 ccw(c2759.92,3264.64) v1@2776.14,3248.43 ; v1@2778.97,3237.82 ccw(c2769.58,3228.43) 2769.58,3241.71 ccw(c2769.58,3254.99) v1@2778.97,3245.6
ATE.UIO.IO31: J33.A35 PROTOTYPE1.H30 U8.N1 UH2.15 | length 10161.6
  Top Layer w4: J33.A35@-785.98,2849.71 -685,2849.71 -677,2841.71 v1(-650.48,2841.71) ; J33.A35@-711.58,2844.21 cw(c-698.3,2830.93) -698.3,2849.71 ; J33.A35@-711.58,2855.21 ccw(c-698.3,2868.49) -698.3,2849.71 ; J33.A35@-708.76,2841.38 cw(c-688.65,2821.27) -688.65,2849.71 cw(c-688.64,2878.15) J33.A35@-708.76,2858.04 ; v1@-657.19,2834.99 ccw(c-673.41,2818.77) -673.41,2841.71 ccw(c-673.41,2864.64) v1@-657.19,2848.43 ; v1@-654.36,2837.82 ccw(c-663.75,2828.43) -663.75,2841.71 ccw(c-663.75,2854.99) v1@-654.36,2845.6 ; UH2.15@3054.29,4693.77 cw(c3007.3,4646.78) 3073.76,4646.78 cw(c3140.21,4646.78) UH2.15@3093.22,4693.77 ; UH2.15@3057.12,4696.6 cw(c3016.96,4656.43) 3073.76,4656.43 cw(c3130.56,4656.43) UH2.15@3090.4,4696.6 ; UH2.15@3059.95,4699.43 cw(c3026.61,4666.09) 3073.76,4666.09 cw(c3120.9,4666.09) UH2.15@3087.57,4699.43 ; UH2.15@3062.78,4702.25 cw(c3036.27,4675.75) 3073.76,4675.75 cw(c3111.24,4675.75) UH2.15@3084.74,4702.25 ; UH2.15@3073.76,4713.23 3073.76,4310.6 PROTOTYPE1.H30@3176.12,4208.23 ; PROTOTYPE1.H30@3147.12,4208.23 ccw(c3077.11,4208.23) 3126.62,4257.74 ccw(c3176.12,4307.25) PROTOTYPE1.H30@3176.12,4237.23 ; PROTOTYPE1.H30@3151.12,4208.23 ccw(c3090.77,4208.23) 3133.44,4250.91 ccw(c3176.12,4293.59) PROTOTYPE1.H30@3176.12,4233.23 ; PROTOTYPE1.H30@3155.12,4208.23 ccw(c3104.42,4208.23) 3140.27,4244.08 ccw(c3176.12,4279.93) PROTOTYPE1.H30@3176.12,4229.23 ; PROTOTYPE1.H30@3159.12,4208.23 ccw(c3118.08,4208.23) 3147.1,4237.26 ccw(c3176.12,4266.28) PROTOTYPE1.H30@3176.12,4225.23 ; PROTOTYPE1.H30@3163.12,4208.23 ccw(c3131.74,4208.23) 3153.93,4230.43 ccw(c3176.12,4252.62) PROTOTYPE1.H30@3176.12,4221.23 ; v1(4610,4190) 4677.17,4190 4687.88,4200.71 4707.52,4200.71 4727.52,4220.71 4759.61,4220.71 4770.63,4209.69 4813,4209.69 ; v1@4613.89,4186.11 cw(c4623.28,4176.72) 4623.28,4190 cw(c4623.28,4203.28) v1@4613.89,4193.89 ; v1@4616.72,4183.28 cw(c4632.93,4167.06) 4632.93,4190 cw(c4632.93,4212.93) v1@4616.72,4196.72 ; 4811.31,4209.69 4813,4209.69 ; 4855.26,4209.68 4856.86,4209.68 ; U8.N1@4892.57,4204.38 ccw(c4879.77,4191.58) 4879.77,4209.69 ccw(c4879.77,4227.79) U8.N1@4892.57,4214.99 ; U8.N1@4892.68,4204.49 ccw(c4880.15,4191.96) 4880.15,4209.69 ccw(c4880.15,4227.41) U8.N1@4892.68,4214.88 ; U8.N1@4897.87,4209.69 4870,4209.69 4860,4209.69 4825,4209.69 4813,4209.69
  MidLayer1 w4: v1@-659.98,2841.71 ccw(c-682.91,2841.71) -666.69,2857.93 ccw(c-650.48,2874.14) v1@-650.48,2851.21 ; v1@-655.98,2841.71 ccw(c-669.25,2841.71) -659.86,2851.1 ccw(c-650.48,2860.49) v1@-650.48,2847.21 ; v1(-650.48,2841.71) -709.81,2901.04 -709.81,3021.46 -681.22,3050.04 -572.33,3050.04 -529,3093.37 -529,3201.2 ; -528.98,3201.22 -528.98,3412.99 -395,3546.97 -395,3602.38 -428.81,3636.19 -428.81,3737.82 -293.23,3873.4 -293.23,4003.46 -295,4005.23 -295,4148.18 -84.81,4358.37 v1(-84.81,4475.04) ; v1@-91.53,4468.32 cw(c-107.74,4452.11) -84.81,4452.11 cw(c-61.87,4452.11) v1@-78.09,4468.32 ; v1@-88.7,4471.15 cw(c-98.09,4461.76) -84.81,4461.76 cw(c-71.53,4461.76) v1@-80.92,4471.15 ; v1@3873.52,4323.87 cw(c3873.52,4300.94) 3889.74,4317.16 cw(c3905.96,4333.37) v1@3883.02,4333.37 ; v1@3873.52,4327.87 cw(c3873.52,4314.6) 3882.91,4323.99 cw(c3892.3,4333.37) v1@3879.02,4333.37 ; v1(3873.52,4333.37) 3921.9,4285 4286.79,4285 4310,4308.21 4353.21,4308.21 4361.54,4316.54 4419.66,4316.54 4468.86,4267.35 4468.86,4229.71 4499.86,4198.71 4601.29,4198.71 v1(4610,4190) ; 4566.04,4198.71 cw(c4566.04,4146.04) v1@4603.28,4183.28 ; 4575.7,4198.71 cw(c4575.7,4155.7) v1@4606.11,4186.11 ; 4585.36,4198.71 cw(c4585.36,4165.36) v1@4608.94,4188.94 ; 4595.01,4198.71 cw(c4595.01,4175.01) v1@4611.77,4191.77
  MidLayer2 w4: v1(-84.81,4475.04) 397.94,4475.04 518.71,4595.81 854.19,4595.81 885.5,4564.5 1449.3,4564.5 1460.17,4575.37 1502.19,4575.37 1529.56,4548 3058,4548 3073.76,4563.76 UH2.15@3073.76,4713.23 ; v1@-80.92,4471.15 cw(c-71.53,4461.76) -71.53,4475.04 cw(c-71.53,4488.32) v1@-80.92,4478.93 ; v1@-78.09,4468.32 cw(c-61.87,4452.11) -61.87,4475.04 cw(c-61.87,4497.98) v1@-78.09,4481.76 ; UH2.15@3054.29,4693.77 cw(c3007.3,4646.78) 3073.76,4646.78 cw(c3140.22,4646.78) UH2.15@3093.22,4693.77 ; UH2.15@3057.12,4696.6 cw(c3016.96,4656.43) 3073.76,4656.43 cw(c3130.56,4656.43) UH2.15@3090.4,4696.6 ; UH2.15@3059.95,4699.43 cw(c3026.62,4666.09) 3073.76,4666.09 cw(c3120.9,4666.09) UH2.15@3087.57,4699.43 ; UH2.15@3062.78,4702.25 cw(c3036.27,4675.75) 3073.76,4675.75 cw(c3111.25,4675.75) UH2.15@3084.74,4702.25 ; PROTOTYPE1.H30@3155.62,4228.74 ccw(c3106.1,4278.25) 3176.12,4278.25 ; PROTOTYPE1.H30@3158.44,4225.91 ccw(c3115.76,4268.6) 3176.12,4268.6 ccw(c3236.47,4268.58) PROTOTYPE1.H30@3193.8,4225.91 ; PROTOTYPE1.H30@3161.27,4223.08 ccw(c3125.42,4258.94) 3176.12,4258.94 ccw(c3226.81,4258.93) PROTOTYPE1.H30@3190.97,4223.08 ; PROTOTYPE1.H30@3164.1,4220.26 ccw(c3135.07,4249.28) 3176.12,4249.28 ccw(c3217.16,4249.27) PROTOTYPE1.H30@3188.14,4220.26 ; PROTOTYPE1.H30@3166.93,4217.43 ccw(c3144.73,4239.63) 3176.12,4239.63 ccw(c3207.5,4239.61) PROTOTYPE1.H30@3185.31,4217.43 ; PROTOTYPE1.H30@3176.12,4208.23 3176.12,4316.31 3193.19,4333.37 3723.52,4333.37 3734.19,4322.71 3781.86,4322.71 3792.52,4333.37 v1(3873.52,4333.37) ; 3176.12,4278.24 ccw(c3246.13,4278.24) PROTOTYPE1.H30@3196.63,4228.74 ; v1@3866.81,4326.66 ccw(c3850.59,4310.44) 3850.59,4333.37 ccw(c3850.59,4356.31) v1@3866.81,4340.09 ; v1@3869.64,4329.49 ccw(c3860.25,4320.1) 3860.25,4333.37 ccw(c3860.25,4346.65) v1@3869.64,4337.26
ATE.UIO.IO32: J33.B36 PROTOTYPE1.H31 U8.P9 UH2.16 | length 10071.3
  Top Layer w4: UH2.16@3073.76,4813.23 3109.4,4777.59 ; UH2.16@3077.91,4794.15 cw(c3082.8,4771.7) 3099.04,4787.95 cw(c3115.29,4804.2) UH2.16@3092.84,4809.08 ; UH2.16@3078.76,4790.24 cw(c3084.65,4763.19) 3104.22,4782.77 cw(c3123.8,4802.34) UH2.16@3096.75,4808.23 ; UH2.16@3079.61,4786.34 cw(c3086.5,4754.69) 3109.4,4777.59 ; UH2.16@3100.66,4807.38 ccw(c3132.31,4800.49) 3109.4,4777.59 ; PROTOTYPE1.H31@3255.62,4228.74 ccw(c3206.11,4278.25) 3276.12,4278.25 ccw(c3346.13,4278.25) PROTOTYPE1.H31@3296.63,4228.74 ; PROTOTYPE1.H31@3258.44,4225.91 ccw(c3215.77,4268.59) 3276.12,4268.59 ccw(c3336.48,4268.59) PROTOTYPE1.H31@3293.8,4225.91 ; PROTOTYPE1.H31@3261.27,4223.08 ccw(c3225.42,4258.93) 3276.12,4258.93 ccw(c3326.82,4258.93) PROTOTYPE1.H31@3290.97,4223.08 ; v1@3264.02,4308.37 ccw(c3241.09,4308.37) 3257.31,4324.59 ccw(c3273.52,4340.81) v1@3273.52,4317.87 ; PROTOTYPE1.H31@3264.1,4220.26 ccw(c3235.08,4249.28) 3276.12,4249.28 ccw(c3317.16,4249.28) PROTOTYPE1.H31@3288.14,4220.26 ; v1@3266.81,4301.66 cw(c3244.32,4279.17) 3276.12,4279.17 ; PROTOTYPE1.H31@3266.93,4217.43 ccw(c3244.74,4239.62) 3276.12,4239.62 ccw(c3307.51,4239.62) PROTOTYPE1.H31@3285.31,4217.43 ; v1@3268.02,4308.37 ccw(c3254.75,4308.37) 3264.14,4317.76 ccw(c3273.52,4327.15) v1@3273.52,4313.87 ; v1@3269.64,4304.49 cw(c3253.98,4288.83) 3276.12,4288.83 ; PROTOTYPE1.H31@3276.12,4208.23 3276.12,4305.78 v1(3273.52,4308.37) 3109.4,4472.49 3109.4,4777.59 ; 3276.12,4291.71 cw(c3290.19,4291.71) v1@3280.24,4301.66 ; v3(5193.15,4150.63) U8.P9@5212.83,4170.31 ; U8.P9@5205.33,4170.31 cw(c5187.23,4170.31) 5200.03,4157.51 cw(c5212.83,4144.71) U8.P9@5212.83,4162.81 ; U8.P9@5205.49,4170.31 cw(c5187.77,4170.31) 5200.3,4157.78 cw(c5212.83,4145.25) U8.P9@5212.83,4162.97 ; 5205.95,4163.43 cw(c5193.15,4176.24) 5193.15,4158.13 ccw(c5193.15,4176.24) 5205.95,4163.43 ; 5205.95,4163.43 ccw(c5218.76,4150.63) 5200.65,4150.63 cw(c5218.76,4150.63) 5205.95,4163.43
  MidLayer1 w4: v1(2916.19,3150.04) 2923.52,3150.04 3123.52,3350.04 3123.52,4143.52 3140,4160 3227.89,4160 ; v1@2916.19,3151.54 ccw(c2916.19,3172.87) 2931.27,3157.79 ; v1@2916.19,3155.54 ccw(c2916.19,3186.52) 2938.1,3164.62 ; v1@2916.19,3159.54 ccw(c2916.19,3200.18) 2944.93,3171.44 ; v1@2925.69,3150.04 cw(c2930.92,3150.04) 2927.22,3153.74 ; PROTOTYPE1.H31@3247.13,4207.7 cw(c3181.42,4206.47) 3227.89,4160 ; PROTOTYPE1.H31@3251.13,4207.77 cw(c3194.48,4206.72) 3234.54,4166.66 cw(c3274.6,4126.59) PROTOTYPE1.H31@3275.66,4183.24 ; PROTOTYPE1.H31@3255.12,4207.84 cw(c3207.54,4206.96) 3241.19,4173.31 cw(c3274.85,4139.66) PROTOTYPE1.H31@3275.73,4187.24 ; PROTOTYPE1.H31@3259.12,4207.92 cw(c3220.61,4207.2) 3247.85,4179.96 cw(c3275.09,4152.72) PROTOTYPE1.H31@3275.8,4191.24 ; PROTOTYPE1.H31@3275.58,4179.24 ccw(c3274.36,4113.53) 3227.89,4160 ; PROTOTYPE1.H31@3276.12,4208.23 3227.89,4160
  MidLayer2 w4: v1@-476.53,2809.99 ccw(c-492.74,2793.77) -492.74,2816.71 ccw(c-492.74,2839.64) v1@-476.53,2823.43 ; v1@-473.7,2812.82 ccw(c-483.09,2803.43) -483.09,2816.71 ccw(c-483.09,2829.99) v1@-473.7,2820.6 ; v1(-469.81,2816.71) -661.71,2816.71 -670,2825 -670,2907.38 -661.14,2916.24 -661.14,2924.37 -518.81,3066.71 189.61,3066.71 362.31,2894 1219,2894 1231.86,2906.86 1231.86,2950.37 1265.19,2983.71 1265.19,3032.04 1358.19,3125.04 2197.92,3125.04 2214.25,3141.37 2628.63,3141.37 2636.96,3133.04 2899.19,3133.04 v1(2916.19,3150.04) ; v1@2906.69,3150.04 cw(c2883.76,3150.04) 2899.97,3133.82 cw(c2916.19,3117.61) v1@2916.19,3140.54 ; v1@2910.69,3150.04 cw(c2897.41,3150.04) 2906.8,3140.65 cw(c2916.19,3131.26) v1@2916.19,3144.54
  Bottom Layer w4: J33.B36@-785.98,2810.34 -545,2810.34 -538.63,2816.71 v1(-469.81,2816.71) ; J33.B36@-711.58,2804.84 cw(c-698.3,2791.56) -698.3,2810.34 cw(c-698.3,2829.12) J33.B36@-711.58,2815.84 ; J33.B36@-708.76,2802.01 cw(c-688.65,2781.9) -688.65,2810.34 cw(c-688.64,2838.78) J33.B36@-708.76,2818.67 ; v1@-476.53,2809.99 ccw(c-492.74,2793.77) -492.74,2816.71 ccw(c-492.74,2839.64) v1@-476.53,2823.43 ; v1@-473.7,2812.82 ccw(c-483.09,2803.43) -483.09,2816.71 ccw(c-483.09,2829.99) v1@-473.7,2820.6 ; v1(3273.52,4308.37) 3341.19,4376.04 3361.04,4376.04 4041.6,4376.04 4250.93,4166.71 4419.65,4166.71 4444.65,4141.71 4481.86,4141.71 4498.52,4158.37 4548.52,4158.37 4586.9,4120 4770.15,4120 4785.27,4135.12 4855.26,4135.12 4860,4135.12 4870,4135.12 5076.1,4135.12 5169.64,4135.12 ccw(c5169.64,4149.17) 5179.57,4139.24 ; v1@3273.52,4313.87 ccw(c3273.52,4327.15) 3282.91,4317.76 ccw(c3292.3,4308.37) v1@3279.02,4308.37 ; v1@3273.52,4317.87 ccw(c3273.52,4340.81) 3289.74,4324.59 ccw(c3305.96,4308.37) v1@3283.02,4308.37 ; v3@5185.68,4151.28 cw(c5167.64,4152.86) 5179.28,4138.99 cw(c5190.92,4125.12) v3@5192.5,4143.16
ATE.UIO.IO33: J33.A36 PROTOTYPE1.H32 U8.P4 UH2.17 | length 10171.6
  Top Layer w4: J33.A36@-785.98,2810.34 -527.49,2810.34 -484.14,2853.69 -484.14,3150.71 -235.05,3399.8 -217.35,3417.5 -217.35,3575.02 -100.05,3692.32 -94,3698.37 -94,3821.31 -9.14,3906.17 -9.14,4023.02 -43.14,4057.02 -43.14,4078.17 -13,4108.31 -13,4408 -25,4420 -25,4439.75 18.63,4483.37 228.86,4483.37 270.52,4525.04 v1(270.52,4650.04) ; J33.A36@-711.58,2804.84 cw(c-698.3,2791.56) -698.3,2810.34 cw(c-698.3,2829.12) J33.A36@-711.58,2815.84 ; J33.A36@-708.76,2802.01 cw(c-688.65,2781.9) -688.65,2810.34 cw(c-688.64,2838.78) J33.A36@-708.76,2818.67 ; v1@263.81,4643.32 cw(c247.59,4627.11) 270.52,4627.11 cw(c293.46,4627.11) v1@277.24,4643.32 ; v1@266.64,4646.15 cw(c257.25,4636.76) 270.52,4636.76 cw(c283.8,4636.76) v1@274.41,4646.15 ; UH2.17@3146.33,4715.55 ccw(c3096.5,4719.77) 3131.86,4755.13 ; UH2.17@3150.31,4715.22 ccw(c3107.72,4718.82) 3137.95,4749.04 ccw(c3168.17,4779.27) UH2.17@3171.77,4736.68 ; UH2.17@3154.3,4714.88 ccw(c3118.95,4717.87) 3144.04,4742.96 ccw(c3169.12,4768.04) UH2.17@3172.11,4732.69 ; UH2.17@3158.29,4714.54 ccw(c3130.18,4716.92) 3150.12,4736.87 ccw(c3170.07,4756.81) UH2.17@3172.45,4728.71 ; UH2.17@3171.44,4740.66 cw(c3167.22,4790.5) 3131.86,4755.13 ; UH2.17@3173.76,4713.23 3131.86,4755.13 ; PROTOTYPE1.H32@3355.62,4228.74 ccw(c3312.38,4271.98) 3373.52,4271.98 ; PROTOTYPE1.H32@3358.44,4225.91 ccw(c3322.04,4262.32) 3373.52,4262.32 ; PROTOTYPE1.H32@3361.27,4223.08 ccw(c3331.69,4252.66) 3373.52,4252.66 ; PROTOTYPE1.H32@3364.1,4220.26 ccw(c3341.35,4243.01) 3373.52,4243.01 ; v1@3366.81,4418.32 cw(c3350.59,4402.11) 3373.52,4402.11 cw(c3396.46,4402.11) v1@3380.24,4418.32 ; v1@3366.81,4431.76 ccw(c3350.59,4447.98) 3373.52,4447.98 ccw(c3396.46,4447.98) v1@3380.24,4431.76 ; v1@3369.64,4421.15 cw(c3360.25,4411.76) 3373.52,4411.76 cw(c3386.8,4411.76) v1@3377.41,4421.15 ; v1@3369.64,4428.93 ccw(c3360.25,4438.32) 3373.52,4438.32 ccw(c3386.8,4438.32) v1@3377.41,4428.93 ; 3373.52,4245.89 ccw(c3413.78,4245.89) PROTOTYPE1.H32@3385.31,4217.43 ; 3373.52,4255.55 ccw(c3423.43,4255.55) PROTOTYPE1.H32@3388.14,4220.26 ; 3373.52,4265.2 ccw(c3433.09,4265.2) PROTOTYPE1.H32@3390.97,4223.08 ; 3373.52,4274.86 ccw(c3442.75,4274.86) PROTOTYPE1.H32@3393.8,4225.91 ; 3373.52,4284.52 ccw(c3452.4,4284.52) PROTOTYPE1.H32@3396.63,4228.74 ; PROTOTYPE1.H32@3376.12,4208.23 3373.52,4210.83 v1(3373.52,4425.04) 3373.52,4766.71 3290.19,4850.04 3148.52,4850.04 3131.86,4833.37 3131.86,4755.13 ; v3(4996.3,4150.63) U8.P4@5015.98,4170.31 ; U8.P4@5008.48,4170.31 cw(c4990.38,4170.31) 5003.18,4157.51 cw(c5015.98,4144.71) U8.P4@5015.98,4162.81 ; U8.P4@5008.64,4170.31 cw(c4990.92,4170.31) 5003.45,4157.78 cw(c5015.98,4145.25) U8.P4@5015.98,4162.97 ; 5009.1,4163.43 cw(c4996.3,4176.24) 4996.3,4158.13 ccw(c4996.3,4176.24) 5009.1,4163.43 ; 5009.1,4163.43 ccw(c5021.91,4150.63) 5003.8,4150.63 cw(c5021.91,4150.63) 5009.1,4163.43
  MidLayer1 w4: v1@4699.34,4217.83 cw(c4687.8,4204.38) 4705.52,4204.38 ; v1@4701.94,4220.87 cw(c4695.26,4213.08) 4705.52,4213.08 cw(c4715.79,4213.08) v1@4709.11,4220.87 ; v1(4705.52,4225.04) 4705.52,4204.37 ; v1@4711.71,4217.83 ccw(c4723.25,4204.38) 4705.52,4204.38 ; v3@4991.11,4145.44 ccw(c4978.57,4132.9) 4978.57,4150.63 ccw(c4978.57,4168.36) v3@4991.11,4155.82 ; v3(4996.3,4150.63) 4918.62,4150.63 4870,4150.63 4860,4150.63 4793.87,4150.63 4770.79,4173.71 4736.19,4173.71 4705.52,4204.37 ; 4978.19,4150.63 cw(c4978.19,4132.52) 4991,4145.33 ccw(c4978.19,4132.52) 4978.19,4150.63 ; 4978.19,4150.63 ccw(c4978.19,4168.74) 4991,4155.93 cw(c4978.19,4168.74) 4978.19,4150.63
  MidLayer2 w4: v1(270.52,4650.04) 293.96,4650.04 295,4649 463.25,4649 476.44,4635.81 974.07,4635.81 1010.17,4599.71 1634.71,4599.71 1651.71,4616.71 2481.86,4616.71 2523.52,4658.37 2523.52,4743.52 2540,4760 3126.99,4760 UH2.17@3173.76,4713.23 ; v1@274.41,4646.15 cw(c283.8,4636.76) 283.8,4650.04 cw(c283.8,4663.32) v1@274.41,4653.93 ; v1@277.24,4643.32 cw(c293.46,4627.11) 293.46,4650.04 cw(c293.46,4672.98) v1@277.24,4656.76 ; UH2.17@3146.23,4713.33 ccw(c3080.56,4713.56) 3127,4760 ccw(c3173.44,4806.44) UH2.17@3173.66,4740.76 ; UH2.17@3150.23,4713.32 ccw(c3094.1,4713.51) 3133.79,4753.2 ccw(c3173.48,4792.9) UH2.17@3173.68,4736.76 ; UH2.17@3154.23,4713.3 ccw(c3107.64,4713.46) 3140.59,4746.41 ccw(c3173.53,4779.35) UH2.17@3173.69,4732.76 ; UH2.17@3158.23,4713.29 ccw(c3121.19,4713.42) 3147.38,4739.61 ccw(c3173.58,4765.81) UH2.17@3173.71,4728.76
  Bottom Layer w4: v1@3373.52,4415.54 cw(c3373.52,4392.61) 3389.74,4408.82 cw(c3405.96,4425.04) v1@3383.02,4425.04 ; v1@3373.52,4419.54 cw(c3373.52,4406.26) 3382.91,4415.65 cw(c3392.3,4425.04) v1@3379.02,4425.04 ; v1(3373.52,4425.04) 3390.52,4408.04 4054.86,4408.04 4083.58,4379.32 4212.86,4250.04 4412.21,4250.04 4420.54,4258.37 4478.86,4258.37 4572.73,4164.5 4667.4,4164.5 4681.86,4150.04 4710.04,4150.04 4723.52,4163.52 4723.52,4185.04 4705.52,4203.04 ; v1@4699.01,4218.13 cw(c4684.8,4203.04) 4705.52,4203.04 ; v1@4701.75,4221.04 cw(c4693.53,4212.3) 4705.52,4212.3 cw(c4717.52,4212.3) v1@4709.3,4221.04 ; v1(4705.52,4225.04) 4705.52,4203.04 ; v1@4712.04,4218.13 ccw(c4726.25,4203.04) 4705.52,4203.04
ATE.UIO.IO34: J33.A37 PROTOTYPE1.A32 U8.R4 UH2.18 | length 10163.2
  Top Layer w4: J33.A37@-781.91,2775.04 -551.48,2775.04 -493.14,2833.37 -476.14,2850.35 -476.14,3147.39 -209.35,3414.19 -209.35,3571.71 -86,3695.06 -86,3818 -1.14,3902.86 -1.14,4026.33 -34.81,4060 -34.81,4075.19 -5,4105 v1(-5,4435) ; J33.A37@-714.41,2768.3 cw(c-698.14,2752.02) -698.14,2775.04 ; J33.A37@-711.58,2765.47 cw(c-688.48,2742.37) -688.48,2775.04 ; J33.A37@-708.76,2762.64 cw(c-678.82,2732.71) -678.82,2775.04 ; J33.A37@-708.76,2779.3 ccw(c-698.47,2789.58) -698.47,2775.04 ; v1@-11.72,4428.28 cw(c-27.94,4412.06) -5,4412.06 cw(c17.93,4412.06) v1@1.72,4428.28 ; v1@-8.89,4431.11 cw(c-18.28,4421.72) -5,4421.72 cw(c8.28,4421.72) v1@-1.11,4431.11 ; UH2.18@3173.76,4785.71 cw(c3173.76,4719.25) 3220.75,4766.24 cw(c3267.74,4813.23) UH2.18@3201.29,4813.23 ; UH2.18@3173.76,4789.71 cw(c3173.76,4732.91) 3213.92,4773.07 cw(c3254.09,4813.23) UH2.18@3197.29,4813.23 ; UH2.18@3173.76,4793.71 cw(c3173.76,4746.56) 3207.09,4779.9 cw(c3240.43,4813.23) UH2.18@3193.29,4813.23 ; UH2.18@3173.76,4797.71 cw(c3173.76,4760.22) 3200.27,4786.73 cw(c3226.77,4813.23) UH2.18@3189.29,4813.23 ; UH2.18@3173.76,4813.23 3226.07,4760.92 3305,4760.92 3331.86,4734.06 3331.86,4198.71 3376.12,4154.44 ; PROTOTYPE1.A32@3363.51,4134.35 ccw(c3353.81,4154.44) 3376.12,4154.44 ; PROTOTYPE1.A32@3365.25,4130.75 ccw(c3356.89,4148.07) 3376.12,4148.07 ccw(c3395.36,4148.07) PROTOTYPE1.A32@3386.99,4130.75 ; PROTOTYPE1.A32@3366.99,4127.15 ccw(c3359.96,4141.7) 3376.12,4141.7 ccw(c3392.28,4141.7) PROTOTYPE1.A32@3385.25,4127.15 ; PROTOTYPE1.A32@3376.12,4108.23 3376.12,4154.44 ; PROTOTYPE1.A32@3388.73,4134.35 cw(c3398.43,4154.44) 3376.12,4154.44 ; v3(4996.3,4111.26) U8.R4@5015.98,4130.94 ; U8.R4@5008.48,4130.94 cw(c4990.38,4130.94) 5003.18,4118.14 cw(c5015.98,4105.34) U8.R4@5015.98,4123.44 ; U8.R4@5008.64,4130.94 cw(c4990.92,4130.94) 5003.45,4118.41 cw(c5015.98,4105.88) U8.R4@5015.98,4123.6 ; 5009.1,4124.06 cw(c4996.3,4136.87) 4996.3,4118.76 ccw(c4996.3,4136.87) 5009.1,4124.06 ; 5009.1,4124.06 ccw(c5021.91,4111.26) 5003.8,4111.26 cw(c5021.91,4111.26) 5009.1,4124.06
  MidLayer1 w4: v1@4190,4075 4273.82,4075 4330.52,4131.71 4480.19,4131.71 4506.86,4158.37 4556.86,4158.37 4565.19,4150.04 4565.19,4140.04 4581.52,4123.71 4636.78,4123.71 4640.78,4119.71 4692.46,4119.71 4700.66,4127.92 4741.93,4127.92 4749.31,4120.54 4761.95,4120.54 4765.78,4116.71 4800,4116.71 4818.78,4116.71 4824.23,4111.26 4860,4111.26 4870,4111.26 4918.62,4111.26 v3(4996.3,4111.26) ; v1@4194.08,4071.15 cw(c4203.37,4061.86) 4203.37,4075 ; v1@4194.08,4078.93 ccw(c4203.57,4088.42) 4203.57,4075 ; v1@4196.91,4068.32 cw(c4213.03,4052.2) 4213.03,4075 ; v1@4196.91,4081.76 ccw(c4213.22,4098.07) 4213.22,4075 ; v3@4991,4105.96 ccw(c4978.19,4093.15) 4978.19,4111.26 ccw(c4978.19,4129.37) v3@4991,4116.56 ; v3@4991.11,4106.07 ccw(c4978.57,4093.53) 4978.57,4111.26 ccw(c4978.57,4128.99) v3@4991.11,4116.45
  MidLayer2 w4: v1@-5,4428.5 ccw(c-5,4445.36) 6.92,4433.44 ; v1@-5,4432.5 ccw(c-5,4459.01) 13.75,4440.27 ; v1(-5,4435) 8.48,4435 40.52,4467.04 401.26,4467.04 522.03,4587.81 850.88,4587.81 882.19,4556.5 1452.61,4556.5 1463.49,4567.37 1498.88,4567.37 1526.25,4540 3200.19,4540 3215.19,4555 3215.19,4771.8 ; v1@-5,4436.5 ccw(c-5,4472.67) 20.58,4447.09 ; v1@-5,4440.5 ccw(c-5,4486.33) 27.41,4453.92 ; v1@-5,4444.5 ccw(c-5,4499.98) 34.23,4460.75 ; UH2.18@3173.76,4813.23 3215.19,4771.8 ; UH2.18@3175.2,4797.77 cw(c3177.75,4770.48) 3197.13,4789.86 cw(c3216.51,4809.25) UH2.18@3189.22,4811.79 ; UH2.18@3175.57,4793.79 cw(c3178.78,4759.47) 3203.15,4783.84 cw(c3227.52,4808.22) UH2.18@3193.2,4811.42 ; UH2.18@3175.94,4789.81 cw(c3179.8,4748.46) 3209.17,4777.82 cw(c3238.53,4807.19) UH2.18@3197.18,4811.05 ; UH2.18@3176.32,4785.83 cw(c3180.83,4737.45) 3215.19,4771.8 ; UH2.18@3201.17,4810.68 ccw(c3249.55,4806.16) 3215.19,4771.8
  Bottom Layer w4: PROTOTYPE1.A32@3376.12,4108.23 3376.12,4108.37 3506.86,4108.37 3523.52,4091.71 3523.52,3991.71 3548.52,3966.71 3648.52,3966.71 3723.52,4041.71 3940.19,4041.71 3965.19,4016.71 3990.19,4016.71 4006.86,4033.37 4148.52,4033.37 v1(4190.19,4075.04) ; PROTOTYPE1.A32@3385.31,4099.04 cw(c3407.84,4076.51) 3407.84,4108.37 ; PROTOTYPE1.A32@3385.31,4117.43 ccw(c3407.17,4139.28) 3407.17,4108.37 ; PROTOTYPE1.A32@3388.14,4096.21 cw(c3417.5,4066.85) 3417.5,4108.37 ; PROTOTYPE1.A32@3388.14,4120.26 ccw(c3416.82,4148.94) 3416.82,4108.37 ; PROTOTYPE1.A32@3390.97,4093.39 cw(c3427.16,4057.2) 3427.16,4108.37 ; PROTOTYPE1.A32@3390.97,4123.08 ccw(c3426.48,4158.59) 3426.48,4108.37 ; PROTOTYPE1.A32@3393.8,4090.56 cw(c3436.81,4047.54) 3436.81,4108.37 ; PROTOTYPE1.A32@3393.8,4125.91 ccw(c3436.14,4168.25) 3436.14,4108.37 ; PROTOTYPE1.A32@3396.63,4087.73 cw(c3446.47,4037.88) 3446.47,4108.37 ; PROTOTYPE1.A32@3396.63,4128.74 ccw(c3445.8,4177.91) 3445.8,4108.37 ; v1@4180.69,4075.04 cw(c4157.76,4075.04) 4173.97,4058.82 cw(c4190.19,4042.61) v1@4190.19,4065.54 ; v1@4184.69,4075.04 cw(c4171.41,4075.04) 4180.8,4065.65 cw(c4190.19,4056.26) v1@4190.19,4069.54
ATE.UIO.IO35: J33.B37 PROTOTYPE1.B32 U8.R10 UH2.19 | length 10295.6
  Top Layer w4: UH2.19@3273.76,4713.23 3320,4666.99 3320,4064.36 PROTOTYPE1.B32@3376.12,4008.23 ; UH2.19@3273.94,4697.71 cw(c3274.35,4661.66) 3299.84,4687.15 cw(c3325.33,4712.64) UH2.19@3289.29,4713.06 ; UH2.19@3273.98,4693.71 cw(c3274.5,4648.38) 3306.56,4680.43 cw(c3338.61,4712.49) UH2.19@3293.28,4713.01 ; UH2.19@3274.03,4689.71 cw(c3274.66,4635.09) 3313.28,4673.71 cw(c3351.9,4712.34) UH2.19@3297.28,4712.96 ; UH2.19@3274.08,4685.71 cw(c3274.81,4621.81) 3320,4667 cw(c3365.18,4712.18) UH2.19@3301.28,4712.92 ; PROTOTYPE1.B32@3347.12,4008.23 ccw(c3277.11,4008.23) 3326.62,4057.74 ccw(c3376.12,4107.25) PROTOTYPE1.B32@3376.12,4037.23 ; PROTOTYPE1.B32@3351.12,4008.23 ccw(c3290.77,4008.23) 3333.44,4050.91 ccw(c3376.12,4093.59) PROTOTYPE1.B32@3376.12,4033.23 ; PROTOTYPE1.B32@3355.12,4008.23 ccw(c3304.42,4008.23) 3340.27,4044.08 ccw(c3376.12,4079.93) PROTOTYPE1.B32@3376.12,4029.23 ; PROTOTYPE1.B32@3359.12,4008.23 ccw(c3318.08,4008.23) 3347.1,4037.26 ccw(c3376.12,4066.28) PROTOTYPE1.B32@3376.12,4025.23 ; PROTOTYPE1.B32@3363.12,4008.23 ccw(c3331.74,4008.23) 3353.93,4030.43 ccw(c3376.12,4052.62) PROTOTYPE1.B32@3376.12,4021.23 ; v3(5232.52,4111.26) U8.R10@5252.2,4130.94 ; U8.R10@5244.7,4130.94 cw(c5226.6,4130.94) 5239.4,4118.14 cw(c5252.2,4105.34) U8.R10@5252.2,4123.44 ; U8.R10@5244.86,4130.94 cw(c5227.14,4130.94) 5239.67,4118.41 cw(c5252.2,4105.88) U8.R10@5252.2,4123.6 ; 5245.32,4124.06 cw(c5232.52,4136.87) 5232.52,4118.76 ccw(c5232.52,4136.87) 5245.32,4124.06 ; 5245.32,4124.06 ccw(c5258.13,4111.26) 5240.02,4111.26 cw(c5258.13,4111.26) 5245.32,4124.06
  MidLayer1 w4: v1(2695,2725) 2809.19,2725 3331.86,3247.67 3331.86,3963.97 ; v1@2698.89,2721.11 cw(c2708.28,2711.72) 2708.28,2725 cw(c2708.28,2738.28) v1@2698.89,2728.89 ; v1@2701.72,2718.28 cw(c2717.93,2702.06) 2717.93,2725 cw(c2717.93,2747.93) v1@2701.72,2731.72 ; PROTOTYPE1.B32@3347.22,4005.85 cw(c3294.34,4001.49) 3331.86,3963.97 ; PROTOTYPE1.B32@3351.21,4006.18 cw(c3305.62,4002.42) 3337.96,3970.08 cw(c3370.31,3937.74) PROTOTYPE1.B32@3374.07,3983.32 ; PROTOTYPE1.B32@3355.19,4006.51 cw(c3316.9,4003.35) 3344.07,3976.18 cw(c3371.24,3949.02) PROTOTYPE1.B32@3374.39,3987.31 ; PROTOTYPE1.B32@3359.18,4006.84 cw(c3328.18,4004.28) 3350.17,3982.29 cw(c3372.17,3960.3) PROTOTYPE1.B32@3374.72,3991.29 ; PROTOTYPE1.B32@3373.74,3979.33 ccw(c3369.37,3926.46) 3331.86,3963.97 ; PROTOTYPE1.B32@3376.12,4008.23 3331.86,3963.97
  MidLayer2 w4: v1(490.19,3000.04) 631.86,3000.04 v1(699.19,2932.71) ; v1@494.08,2996.15 cw(c503.47,2986.76) 503.47,3000.04 cw(c503.47,3013.32) v1@494.08,3003.93 ; v1@496.91,2993.32 cw(c513.13,2977.11) 513.13,3000.04 cw(c513.13,3022.98) v1@496.91,3006.76 ; v1@689.69,2932.71 ccw(c666.76,2932.71) 682.97,2948.93 ccw(c699.19,2965.14) v1@699.19,2942.21 ; v1@693.69,2932.71 ccw(c680.41,2932.71) 689.8,2942.1 ccw(c699.19,2951.49) v1@699.19,2938.21 ; PROTOTYPE1.B32@3347.54,4013.15 ccw(c3308.55,4019.86) 3336.53,4047.83 ; PROTOTYPE1.B32@3351.48,4012.47 ccw(c3317.87,4018.25) 3341.99,4042.37 ccw(c3366.1,4066.48) PROTOTYPE1.B32@3371.88,4032.87 ; PROTOTYPE1.B32@3355.43,4011.79 ccw(c3327.19,4016.65) 3347.45,4036.91 ccw(c3367.71,4057.16) PROTOTYPE1.B32@3372.56,4028.93 ; PROTOTYPE1.B32@3359.37,4011.12 ccw(c3336.51,4015.05) 3352.91,4031.45 ccw(c3369.31,4047.84) PROTOTYPE1.B32@3373.24,4024.99 ; PROTOTYPE1.B32@3371.21,4036.82 cw(c3364.5,4075.8) 3336.53,4047.83 ; PROTOTYPE1.B32@3376.12,4008.23 3336.52,4047.83 ; v1@3689.02,4175.04 cw(c3666.09,4175.04) 3682.31,4158.82 cw(c3698.52,4142.61) v1@3698.52,4165.54 ; v1@3693.02,4175.04 cw(c3679.75,4175.04) 3689.13,4165.65 cw(c3698.52,4156.26) v1@3698.52,4169.54 ; v1(3698.52,4175.04) 3681.86,4158.37 3372.19,4158.37 3336.52,4122.71 3336.52,4047.83
  Bottom Layer w4: J33.B37@-785.98,2770.97 -480.55,2770.97 -451.48,2800.04 -451.48,3033.37 -434.81,3050.04 440.19,3050.04 v1(490.19,3000.04) ; J33.B37@-711.58,2765.47 cw(c-698.3,2752.19) -698.3,2770.97 cw(c-698.3,2789.75) J33.B37@-711.58,2776.47 ; J33.B37@-708.76,2762.64 cw(c-688.65,2742.53) -688.65,2770.97 cw(c-688.65,2799.41) J33.B37@-708.76,2779.3 ; v1@480.69,3000.04 ccw(c457.76,3000.04) 473.97,3016.26 ccw(c490.19,3032.48) v1@490.19,3009.54 ; v1@484.69,3000.04 ccw(c471.41,3000.04) 480.8,3009.43 ccw(c490.19,3018.82) v1@490.19,3005.54 ; v1@699.19,2923.21 cw(c699.19,2900.27) 715.41,2916.49 cw(c731.63,2932.71) v1@708.69,2932.71 ; v1@699.19,2927.21 cw(c699.19,2913.93) 708.58,2923.32 cw(c717.97,2932.71) v1@704.69,2932.71 ; v1(699.19,2932.71) 748.52,2883.37 1484.96,2883.37 1498.46,2869.87 1528.69,2869.87 1690.52,2708.04 2678.04,2708.04 v1(2695,2725) ; v1@2685.5,2725 cw(c2662.56,2725) 2678.78,2708.78 cw(c2695,2692.56) v1@2695,2715.5 ; v1@2689.5,2725 cw(c2676.22,2725) 2685.61,2715.61 cw(c2695,2706.22) v1@2695,2719.5 ; v1@3698.52,4165.54 cw(c3698.52,4142.61) 3714.74,4158.82 cw(c3730.96,4175.04) v1@3708.02,4175.04 ; v1@3698.52,4169.54 cw(c3698.52,4156.26) 3707.91,4165.65 cw(c3717.3,4175.04) v1@3704.02,4175.04 ; v1(3698.52,4175.04) 3765.52,4108.04 4106.33,4108.04 4108.29,4110 4195,4110 4221.96,4083.04 4522.13,4083.04 4535,4095.92 4728.67,4095.92 4737.19,4087.4 4855.26,4087.4 4860,4087.4 4870,4087.4 5076.1,4087.4 5095.52,4087.4 5169.64,4087.4 5189.14,4087.4 ccw(c5189.14,4129.13) 5218.65,4099.62 ; v3@5225.05,4111.91 cw(c5207.01,4113.49) 5218.65,4099.62 ; v3@5231.87,4103.79 ccw(c5230.29,4085.75) 5218.65,4099.62